# Altium PCB RADAR_D79_POWER_24V_v0.9.3.37_R10_3_37_REZONIT_IMPEDANCE_RECALC_NATIVE.PcbDoc (part 6 of 9)
Units mil, origin at the board's own origin, x right, y up, seen from the top; angles counter-clockwise.
Board outline 3110.24 x 3110.24 mil, 10 copper layers (Top Layer, RF_GND, SIG_A0, SIG_A1, PWR_A, PWR_B, SIG_B1, SIG_B0, DIGITAL_GND, Bottom Layer), stack 80.001 mil thick; 304 components, 269 nets, 1408 pads, 1372 vias.
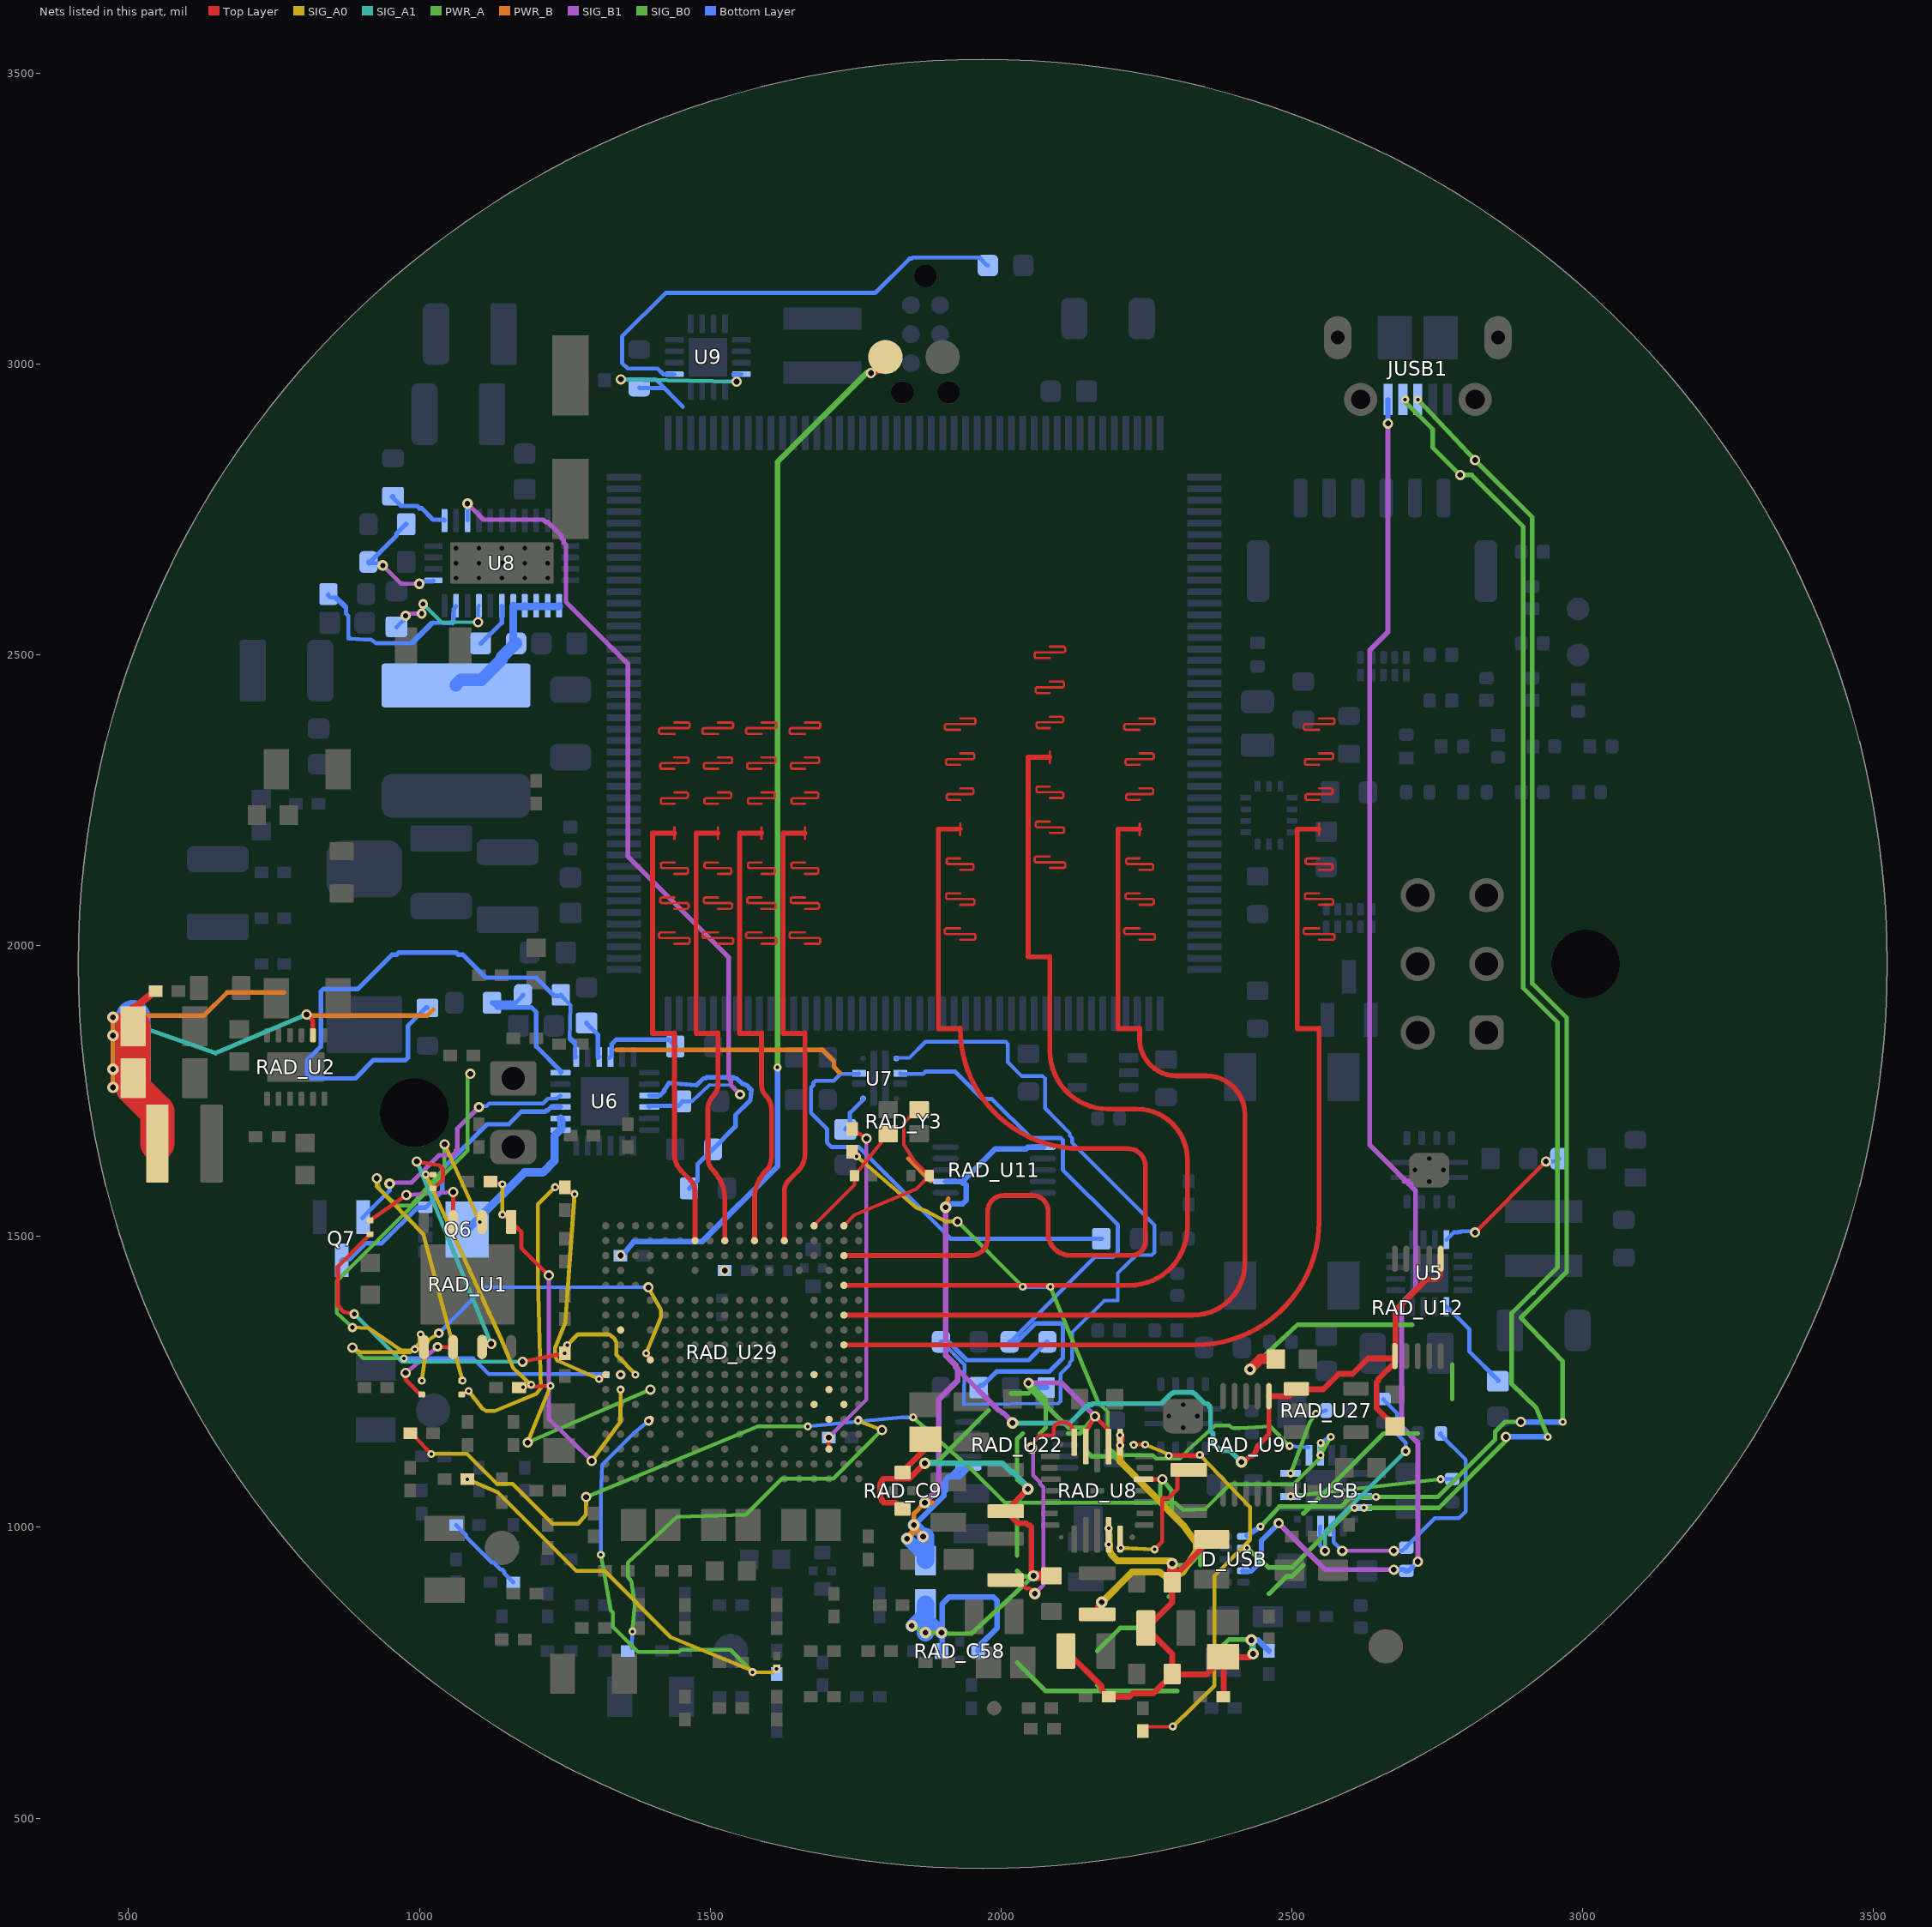
[diagram p14: the nets of this part, all layers, seen from the top]

## Via types
v1: diameter 13.77, hole 5.9, Top Layer to SIG_A0, tented both sides, 393 vias
v2: diameter 17.72, hole 9.84, Top Layer to Bottom Layer, tented both sides, 188 vias
v3: diameter 13.77/13.77/13.77 (per signal layer), hole 5.9, Top Layer to SIG_A0, tented both sides, 120 vias
v4: diameter 13.77, hole 5.9, Top Layer to SIG_A0, tented top, 104 vias
v5: diameter 19.68, hole 9.84, Top Layer to Bottom Layer, 103 vias
v6: diameter 19.68, hole 9.84, Top Layer to Bottom Layer, tented both sides, 93 vias
v7: diameter 13.78, hole 5.91, Top Layer to SIG_A0, tented both sides, 83 vias
v8: diameter 13.78, hole 5.91, SIG_B0 to Bottom Layer, tented both sides, 74 vias
v9: diameter 13.78, hole 5.91, Top Layer to SIG_A0, tented bottom, 55 vias
v10: diameter 13.78, hole 5.91, SIG_B0 to Bottom Layer, tented top, 43 vias
v11: diameter 16.54, hole 7.87, SIG_B0 to Bottom Layer, tented both sides, 22 vias
v12: diameter 22.05, hole 11.81, Top Layer to Bottom Layer, tented both sides, 17 vias
v13: diameter 17.72, hole 9.84, Top Layer to Bottom Layer, 14 vias
v14: diameter 16.54, hole 7.87, Top Layer to Bottom Layer, tented both sides, 11 vias
v15: diameter 18.11, hole 9.06, Top Layer to Bottom Layer, 7 vias
v16: diameter 22.83, hole 11.81, Top Layer to Bottom Layer, 6 vias
v17: diameter 22.05, hole 11.81, Top Layer to Bottom Layer, 6 vias
v18: diameter 22.83, hole 11.81, Top Layer to Bottom Layer, tented both sides, 5 vias
v19: diameter 17.32, hole 8.66, Top Layer to Bottom Layer, 3 vias
v20: diameter 20.47, hole 9.84, Top Layer to Bottom Layer, 3 vias
v21: diameter 16.54, hole 7.87, Top Layer to Bottom Layer, 3 vias
v22: diameter 22.05, hole 11.02, Top Layer to Bottom Layer, 2 vias
v23: diameter 19.68, hole 11.81, Top Layer to Bottom Layer, 2 vias
v24: diameter 19.68, hole 9.84, SIG_A1 to Bottom Layer, 2 vias
v25: diameter 16.54, hole 7.87, SIG_A1 to SIG_B1, tented both sides, 2 vias
v26: diameter 16.54, hole 7.87, Top Layer to SIG_A1, 2 vias
v27: diameter 13.78, hole 5.91, Top Layer to SIG_A0, 2 vias
v28: diameter 18, hole 9.84, Top Layer to Bottom Layer, tented both sides, 1 vias
v29: diameter 18.11, hole 9.06, Top Layer to Bottom Layer, tented both sides, 1 vias
v30: diameter 19.68, hole 9.84, SIG_B0 to Bottom Layer, tented both sides, 1 vias
v31: diameter 17.32, hole 7.87, Top Layer to Bottom Layer, tented both sides, 1 vias
v32: diameter 17.32, hole 7.87, SIG_A1 to Bottom Layer, tented both sides, 1 vias
v33: diameter 19.68, hole 9.84, SIG_B1 to Bottom Layer, 1 vias
v34: diameter 16.54, hole 7.87, SIG_A0 to PWR_B, tented both sides, 1 vias

## Nets (pads, with @x,y where several pads share a name; then routed paths per layer and width w, separated by ;. In a path a pad name is that pad's centre, name@x,y a point inside that pad or via, vN(x,y) a via of type N, cw(c..) or ccw(c..) an arc to the next point about the centre after c; other vN are vias at no path point) (continued)
TI_PVIN3V3: RAD_C3.2 RAD_C6.2 RAD_C8.2 RAD_C9.1 RAD_C9.3 RAD_C15.1 RAD_C31.1 RAD_C58.1 RAD_C58.3 RAD_C143.1 RAD_C144.2 RAD_C153.2 RAD_C199.1 RAD_C200.1 RAD_C201.1 RAD_C202.1 RAD_L1.2 RAD_R125.2 RAD_R200.2 RAD_U8.13 RAD_U8.20 RAD_U8.25 RAD_U8.27 | length 6761.4
  Top Layer w7.48: RAD_U8.27@2145.67,1138.78 2145.67,1164.37 v2(2161.42,1190.75) 2185.04,1167.13 RAD_U8.25@2185.04,1138.78 ; RAD_U8.20@2245.08,1082.68 v2(2277.36,1082.68)
  Top Layer w9.84: RAD_C9.1@1830.71,1031.5 1830.71,1030.51 1818.9,1042.32 1798.23,1042.32 1795.28,1045.28 1795.28,1048.23 1792.32,1051.18 1792.32,1074.8 1795.28,1077.76 1795.28,1080.71 1798.23,1083.66 ; RAD_C9.3@1830.71,1094.49 RAD_C9.3@1830.71,1095.47 ; v5(1869.09,1110.24) 1842.52,1083.66 1798.23,1083.66 ; RAD_C15.1@1870.08,1151.57 1869.09,1151.57 1866.14,1148.62 1866.14,1130.91 RAD_C9.3@1830.71,1095.47 ; v5(2046.26,1065.94) RAD_L1.2@2007.87,1027.56 2028.54,1006.89 2043.31,1006.89 2046.26,1003.94 2049.21,1003.94 2052.17,1000.98 2052.17,918.31 2055.12,915.35 v6(2055.91,916.54) ; RAD_C202.1@2111.22,787.4 2111.22,788.39 2173.23,726.38 2173.23,720.47 RAD_C200.1@2185.04,708.66 2220.47,708.66 2226.38,714.57 2261.81,714.57 RAD_C153.2@2294.29,747.05 ; RAD_C201.1@2249.02,826.77 RAD_C201.1@2250,826.77 ; RAD_C153.2@2294.29,748.03 RAD_C153.2@2294.29,747.05 ; RAD_C6.2@2294.29,905.51 RAD_C6.2@2294.29,906.5 ; RAD_C143.1@2362.2,979.33 2362.2,980.32 2294.29,912.4 RAD_C6.2@2294.29,906.5 ; RAD_R125.2@2381.89,708.66 2382.87,708.66 RAD_C31.1@2382.87,776.57 ; RAD_C31.1@2381.89,777.56 RAD_C31.1@2382.87,776.57 ; v6(2433.07,782.48) 2427.17,776.57 RAD_C31.1@2382.87,776.57 ; 1798.23,1083.66 1818.9,1083.66 RAD_C9.3@1830.71,1095.47 ; RAD_C201.1@2250,826.77 2294.29,782.48 RAD_C153.2@2294.29,747.05 ; RAD_C201.1@2250,826.77 2294.29,871.06 RAD_C6.2@2294.29,906.5 ; RAD_C153.2@2294.29,747.05 2353.35,747.05 RAD_C31.1@2382.87,776.57
  Top Layer w17.72: v6(2055.91,916.54) RAD_C8.2@2086.61,916.34 ; RAD_C6.2@2294.29,905.51 v6(2294.29,937.8) ; v6(2428.35,1271.65) 2446.06,1289.37 RAD_C3.2@2472.44,1289.37
  PWR_A w7.87: v6(1846.46,830.71) v6(1870.08,818.9) v6(1897.64,818.9) 1909.45,816.93 1948.82,816.93 1954.47,822.18 2012.66,876.31 v6(2055.91,916.54) 2047.24,915.35 2037.4,915.35 2027.56,925.2 ; v5(1869.09,1110.24) 1879.92,1112.2 1889.76,1112.2 1916.78,1139.22 1978.35,1200.79 ; 2017.72,1230.32 2047.24,1230.32 ; 2027.56,767.72 2076.77,718.5 2303.15,718.5 ; 2027.56,951.75 2027.56,1013.62 2027.56,1043.31 v5(2046.26,1065.94) ; 2076.77,1200.79 2076.77,1171.26 ; 2115.7,1161.42 2135.83,1161.42 v2(2161.42,1190.75) ; 2145.67,1137.26 2145.67,1131.89 2155.51,1122.05 2194.88,1122.05 2222.98,1093.95 2234.25,1082.68 ; 2288.32,880.84 2293.31,885.83 2293.31,925.2 v6(2294.29,937.8) ; 2293.31,1023.62 2293.31,1029.27 2293.31,1062.99 v2(2277.36,1082.68) ; 2342.52,935.04 2342.52,974.41 ; 2377.16,792.51 2391.73,807.09 2421.26,807.09 v6(2430.12,806.1) 2431.1,797.24 2431.1,787.4 v6(2433.07,782.48) ; 2027.56,1082.68 v5(2046.26,1065.94) ; 2027.56,1082.68 2027.56,1116.64 ; 2027.56,1082.68 v5(2046.26,1065.94) ; 2027.56,1082.68 2027.56,1116.64 ; 2027.56,1082.68 v5(2046.26,1065.94) ; 2027.56,1082.68 2027.56,1116.64 ; 2027.56,1116.64 2027.56,1151.57 ; 2027.56,1116.64 2027.56,1151.57 ; 2027.56,1116.64 2027.56,1151.57 ; 2027.56,1151.57 2037.4,1161.42 ; 2027.56,1151.57 2037.4,1161.42 ; 2027.56,1151.57 2037.4,1161.42 ; 2027.56,1151.57 2037.4,1161.42 ; v2(2047.24,1248.03) 2047.24,1240.16 2079.36,1208.04 2116.14,1171.26 2117.43,1171.26 2145.67,1171.26 ; v2(2047.24,1248.03) 2076.77,1220.47 ; v2(2047.24,1248.03) 2076.77,1220.47 ; 2066.93,1161.42 2076.77,1171.26 ; 2066.93,1161.42 2076.77,1171.26 ; 2066.93,1161.42 2076.77,1171.26 ; 2076.77,1171.26 2076.77,1201.81 ; 2076.77,1171.26 2076.77,1201.81 ; 2076.77,1201.81 2076.77,1220.47 ; 2076.77,1201.81 2076.77,1220.47 ; 2145.67,1171.26 v2(2161.42,1190.75) ; 2145.67,1171.26 v2(2161.42,1190.75) ; 2175.2,718.5 2165.35,728.35 2175.2,718.5 ; 2175.2,718.5 2303.15,718.5 ; 2175.2,718.5 2303.15,718.5 ; 2204.72,826.77 2234.25,826.77 2204.72,826.77 ; 2204.72,826.77 2165.35,787.4 2204.72,826.77 ; 2273.62,1043.31 2273.62,1072.83 ; 2273.62,1043.31 2287.06,1029.87 2273.62,1043.31 ; 2273.62,1043.31 2273.62,1072.83 ; 2273.62,1072.83 v2(2277.36,1082.68) ; 2273.62,1072.83 v2(2277.36,1082.68) ; v6(2294.29,937.8) v6@2303.15,935.04 ; v6(2294.29,937.8) v6@2303.15,935.04 ; v6@2303.15,935.04 2322.83,935.04 ; v6@2303.15,935.04 2322.83,935.04 ; 2322.83,935.04 2342.52,954.72 ; 2322.83,935.04 2342.52,954.72 ; 2342.52,954.72 2342.52,956.98 ; 2342.52,954.72 2342.52,956.98 ; 2342.52,956.98 2342.52,974.41 ; 2342.52,956.98 2342.52,974.41 ; 2471.33,1312.15 2509.84,1348.43 ; 2471.33,1312.15 v6(2428.35,1271.65) 2471.33,1312.15 ; 2471.33,1312.15 2509.84,1348.43 ; 2490.16,915.35 2460.63,885.83 2490.16,915.35 ; 2490.16,915.35 2500,915.35 ; 2490.16,915.35 2500,915.35 ; 2500,915.35 2519.68,935.04 2500,915.35 ; 2509.84,1348.43 2706.69,1348.43 2509.84,1348.43 ; 2657.48,1161.42 2519.68,1023.62 2657.48,1161.42 ; 2657.48,1161.42 2716.54,1161.42 2657.48,1161.42 ; 2775.59,1220.47 2775.59,1279.53 2775.59,1220.47
  SIG_A0 w11.81: v9(2185.04,998.03) 2186.52,960.63 2188.98,954.23 2200.3,942.42 2289.86,942.42 v6(2294.29,937.8)
  SIG_A1 w9.84: v5(1869.09,1110.24) 2001.97,1110.24 2016.73,1095.47 2019.68,1095.47 2043.31,1071.85 2043.31,1068.9 v5(2046.26,1065.94) ; v6(2430.12,806.1) 2433.07,803.15 v6(2433.07,782.48)
  SIG_B1 w8.66: v2(2047.24,1248.03) 2104.33,1248.03 2161.42,1190.94 v2(2161.42,1190.75)
  Bottom Layer w8.66: v2(2047.24,1248.03) 2055.12,1240.16 2078.74,1240.16 RAD_C144.2@2077.76,1240.16
  Bottom Layer w9.84: RAD_C58.3@1897.64,787.4 RAD_C58.3@1898.62,788.39 ; v6(1897.64,818.9) 1898.62,817.91 RAD_C58.3@1898.62,788.39 ; RAD_C58.1@1960.63,787.4 1960.63,788.39 1963.58,791.34 1963.58,797.24 1993.11,826.77 1993.11,874.02 1987.2,879.92 1910.43,879.92 1898.62,868.11 RAD_C58.3@1898.62,788.39 ; v6(2430.12,806.1) 2441.93,806.1 2459.65,788.39 RAD_C199.1@2460.63,787.4
  Bottom Layer w21.65: v6(1846.46,830.71) RAD_R200.2@1870.08,854.33 ; RAD_R200.2@1870.08,846.46 v6(1897.64,818.9)
  Bottom Layer w29.53: v6(1870.08,818.9) RAD_R200.2@1870.08,868.11 ; RAD_R200.2@1870.08,846.46 RAD_R200.2@1870.08,868.11 ; RAD_R200.2@1870.08,854.33 RAD_R200.2@1870.08,868.11
  other v9: 2185.04,970.47
TI_QSPI_CS: RAD_R38.1 RAD_U1.1 RAD_U29.U12 | length 701.2
  Top Layer w6.69: RAD_R38.1@1122.05,1594.49 v7(1142.72,1589.57) ; v7(1142.72,1537.4) RAD_U1.1@1157.48,1525.59
  Top Layer w7.09: RAD_U1.1@1157.68,1524.67 1157.48,1525.59 1175.2,1507.87 1175.2,1480.32 v2(1222.44,1433.07)
  SIG_A0 w6.69: v7(1142.72,1537.4) v7(1142.72,1589.57)
  SIG_A0 w7.09: v2(1296.26,1114.17) 1345.47,1181.1 v9(1345.89,1236.8)
  SIG_B1 w7.09: v2(1222.44,1433.07) 1222.44,1187.01 v2(1296.26,1114.17)
TI_QSPI_D0: RAD_R45.2 RAD_U29.U11
  other v21: 1345.89,1262.39
TI_QSPI_D0_FLASH: RAD_R45.1 RAD_U1.5 | length 1317.4
  Top Layer w6.69: v7(992.13,1306.1) RAD_U1.5@1007.68,1309.98 ; v7(1001.97,1331.69) RAD_U1.5@1010.54,1294.69
  PWR_A w6.69: v14(884.84,1343.5) 858.27,1368.11 858.27,1423.23 1082.68,1647.64 1082.68,1775.59 v2(1087.6,1779.53)
  SIG_A0 w6.69: v2(884.84,1309.06) 897.64,1301.18 984.25,1301.18 1000,1316.93 1000,1329.72 v7(1001.97,1331.69) ; v14(884.84,1343.5) 912.4,1342.52 968.5,1304.13 981.3,1304.13 v7(992.13,1306.1) ; v2@1083.66,1775.59 v2(1087.6,1779.53)
  SIG_B0 w6.69: v2(884.84,1309.06) 903.54,1290.35 v8(973.43,1290.35)
  Bottom Layer w6.69: v8(973.43,1290.35) 1092.52,1290.35 1119.09,1263.78 RAD_R45.1@1322.08,1263.57
TI_QSPI_D1: RAD_R39.1 RAD_R49.1 RAD_U29.V11 | length 942.2
  Top Layer w6.69: RAD_R39.1@1072.83,1228.35 v7(1084.65,1234.25) ; v7(1233.27,1584.65) RAD_R49.1@1250,1584.65 v7(1266.73,1572.83) ; v7(1309.06,1254.92) RAD_U29.V11@1320.3,1262.39
  SIG_A0 w6.69: v7(1084.65,1234.25) 1108.27,1203.74 1115.16,1199.8 1128.94,1199.8 1200.79,1229.33 1208.66,1239.17 1203.74,1429.13 1203.74,1555.12 v7(1233.27,1584.65) ; v7(1266.73,1572.83) 1250.98,1352.36 1233.27,1308.07 1233.27,1293.31 1237.2,1286.42 v7(1309.06,1254.92)
TI_QSPI_D1_FLASH: RAD_R39.2 RAD_U1.2 | length 747.9
  SIG_A0 w6.69: v2(926.67,1599.9) 926.67,1586.12 1006.89,1503.94 v9(1074.02,1252.17) ; v2(1043.31,1658.46) v9(1103.82,1524.67)
  SIG_B0 w6.69: v2(926.67,1599.9) 931.59,1580.71 962.11,1553.15 985.73,1553.15 1043.31,1617.62 v2(1043.31,1658.46)
TI_QSPI_D2: RAD_R42.1 RAD_R43.1 RAD_U29.T11 | length 765.2
  Top Layer w7.09: v14(887.99,1366.54) 870.08,1370.37 859.84,1380.61 859.84,1448.43 RAD_R42.1@915.35,1503.94 ; v2(1177.17,1284.65) v9(1250,1299.21) ; v7(1253.94,1312.99) RAD_R43.1@1255.12,1292.13
  SIG_A0 w7.09: v7(1253.94,1312.99) 1272.64,1331.69 1324.8,1331.69 1328.74,1330.22 1335.63,1324.31 1338.58,1317.42 1338.58,1296.26 v9(1371.48,1262.39)
  SIG_A1 w7.09: v14(887.99,1366.54) 969.88,1284.65 v2(1177.17,1284.65)
TI_QSPI_D2_FLASH: RAD_R42.2 RAD_U1.3 | length 208.5
  Top Layer w7.09: RAD_R42.2@915.35,1527.56 v2(977.56,1571.26) ; RAD_U1.3@1057.68,1524.67 v2(1058.17,1576.38)
  SIG_B1 w7.09: v2(977.56,1571.26) v2(1058.17,1576.38)
TI_QSPI_D3: RAD_R40.2 RAD_R41.1 RAD_U29.R12 | length 837.6
  Top Layer w6.69: v7(1010.83,1606.3) RAD_R40.2@1023.62,1606.3 ; RAD_R41.1@1171.26,1240.16 v7(1191.93,1245.08) ; v9(1178.15,1241.14) v7(1225.39,1243.11)
  SIG_A0 w6.69: v7(1010.83,1606.3) 1141.73,1320.87 1161.42,1273.62 v7(1191.93,1245.08) v9(1178.15,1241.14) ; v2(1186.02,1145.67) v7(1225.39,1243.11)
  SIG_B0 w6.69: v2(1186.02,1145.67) v13(1397.08,1236.8)
TI_QSPI_D3_FLASH: RAD_R40.1 RAD_U1.7 | length 444.2
  Top Layer w7.09: v2(995.47,1628.84) 1033.86,1622.44 1040.26,1616.04 1040.26,1596.85 RAD_R40.1@1023.62,1582.68 ; RAD_U1.7@1107.68,1309.98 v2(1123.43,1315.35)
  SIG_A1 w7.09: v2(995.47,1628.84) v2(1123.43,1315.35)
TI_QSPI_SCLK: RAD_R44.2 RAD_U29.R10 | length 623.1
  Top Layer w6.69: v7(1389.76,1299.21) RAD_U29.R10@1397.08,1287.98
  SIG_A0 w6.69: v9(1003.94,1251.97) 1013.78,1317.91 1015.75,1321.85 v14(1033.46,1333.66) ; v7(1389.76,1299.21) 1415.35,1361.22 1415.35,1373.03 v2(1393.7,1412.4)
  Bottom Layer w6.69: v14(1033.46,1333.66) 1112.2,1413.39 v2(1393.7,1412.4)
TI_QSPI_SCLK_FLASH: RAD_R44.1 RAD_U1.6 | length 147.1
  Top Layer w7.09: v2(976.28,1265.45) 976.28,1253.94 1001.87,1228.35 RAD_R44.1@1003.94,1228.35 ; v14(1031.3,1310.24) RAD_U1.6@1057.68,1309.98
  SIG_B1 w7.09: v2(976.28,1265.45) v14(1031.3,1310.24)
TI_REGOUT_3V3: RAD_C22.2 RAD_C23.1 RAD_C25.1 RAD_C26.1 RAD_C29.1 RAD_C145.1 RAD_L6.2 RAD_R200.1 RAD_U2.8 RAD_U9.6 RAD_U11.2 RAD_U11.6 RAD_U12.1 RAD_U12.6 RAD_U22.6 RAD_U27.1 | length 4996.3
  Top Layer w8: v28(805.91,1881.42) 816.93,1870.39 RAD_U2.8@816.93,1846.06
  Top Layer w8.66: v6(2413.39,1112.2) 2415.35,1114.17 2419.29,1114.17 2427.17,1122.05 2431.1,1122.05 2437.01,1127.95 2437.01,1129.92 2438.98,1131.89 2438.98,1135.83 2440.94,1137.8 2440.94,1139.76 2460.63,1159.45 2460.63,1226.38 RAD_U9.6@2459.65,1225.39
  Top Layer w9.84: RAD_U9.6@2460.63,1225.39 2459.65,1225.39 2495.08,1225.39 RAD_U27.1@2506.89,1237.2 ; RAD_U27.1@2507.87,1238.19 RAD_U27.1@2506.89,1237.2 ; RAD_C145.1@2677.17,1173.23 2678.15,1172.24 2645.67,1204.72 2645.67,1249.02 2648.62,1251.97 2648.62,1254.92 2678.15,1284.45 RAD_U12.6@2678.15,1293.31 ; RAD_U12.6@2677.17,1294.29 RAD_U12.6@2678.15,1293.31 ; RAD_U12.1@2755.91,1461.61 2754.92,1461.61 2754.92,1432.09 2749.02,1426.18 2731.3,1426.18 2678.15,1373.03 RAD_U12.6@2678.15,1293.31 ; RAD_U27.1@2506.89,1237.2 2554.13,1237.2 2580.71,1263.78 2604.33,1263.78 2630.91,1290.35 2675.2,1290.35 RAD_U12.6@2678.15,1293.31
  Top Layer w12.6: RAD_C25.1@507.82,1891.04 RAD_C22.2@546.28,1921.91
  Top Layer w13.78: v6(473.03,1756.27) RAD_C29.1@507.82,1756.27 ; v6(473.03,1787.76) RAD_C29.1@507.82,1787.76 ; v6(473.03,1845.37) RAD_C25.1@507.82,1845.37 ; v6(473.03,1876.87) RAD_C25.1@507.82,1876.87
  Top Layer w17.72: RAD_C25.1@507.82,1861.12 RAD_C25.1@507.82,1891.04
  Top Layer w59.06: RAD_C25.1@507.82,1861.12 507.82,1756.15 549.41,1714.57 RAD_L6.2@549.41,1659.68
  PWR_B w7.87: v6(473.03,1756.27) v6(473.03,1787.76) v6(473.03,1845.37) v6(473.03,1876.87) 482.28,1879.92 531.6,1879.92 629.92,1879.92 669.29,1919.29 762.45,1919.29 767.72,1919.29 ; v28(805.91,1881.42) 816.93,1879.92 864.86,1879.92 1013.78,1879.92 1023.62,1889.76 ; 1338.58,1820.87 1692.91,1820.87 1712.6,1801.18 1712.6,1791.34 1722.44,1781.5 ; v6(1838.58,980.32) 1850.39,994.09 v6(1850.39,1003.94) ; 1840.55,1633.86 1878.69,1595.71 ; v6(1866.14,984.25) v6(1850.39,1003.94) ; 1882.87,1042.32 v5(1869.09,1042.32) 1850.39,1023.62 v6(1850.39,1003.94) ; v5(1904.53,1550.2) 1909.45,1564.96
  PWR_B w11.81: v6(1838.58,980.32) 1850.39,994.09 v6(1850.39,1003.94)
  SIG_A1 w7.87: v6(473.03,1876.87) 649.61,1814.96 v28(805.91,1881.42)
  SIG_A1 w8.66: v6(2019.68,1179.13) 2118.11,1179.13 2147.64,1208.66 2149.61,1208.66 2151.57,1210.63 2155.51,1210.63 2157.48,1212.6 2275.59,1212.6 2293.31,1230.32 2295.28,1230.32 2297.24,1232.28 2328.74,1232.28 2330.71,1230.32 2332.68,1230.32 2350.39,1212.6 2354.33,1212.6 2358.27,1208.66 2358.27,1206.69 2360.24,1204.72 2360.24,1165.35 2364.17,1161.42 2364.17,1145.67 2366.14,1143.7 2366.14,1141.73 2372.05,1135.83 2374.02,1135.83 2375.98,1133.86 2377.95,1133.86 2379.92,1131.89 2393.7,1131.89 v6(2413.39,1112.2)
  SIG_B1 w8.66: 1922.24,1275.59 1921.26,1275.59 1996.06,1200.79 1998.03,1200.79 2001.97,1196.85 2003.94,1196.85 2017.72,1183.07 2017.72,1181.1 v6(2019.68,1179.13)
  SIG_B1 w9.84: v5(1869.09,1042.32) 1892.72,1065.94 1892.72,1219.49 1925.2,1251.97 1925.2,1272.64 1922.24,1275.59 1922.24,1278.54 1904.53,1296.26 v5(1904.53,1550.2)
  Bottom Layer w9.84: v6(1850.39,1003.94) 1851.38,1003.94 1901.57,1054.13 1901.57,1060.04 1904.53,1062.99 1904.53,1080.71 ; v5(1869.09,1042.32) 1904.53,1077.76 1904.53,1080.71 ; v5(1904.53,1550.2) 1910.43,1556.1 1934.06,1556.1 1939.96,1562.01 1939.96,1588.58 1937.01,1591.54 1934.06,1591.54 1931.1,1594.49 RAD_U11.2@1904.53,1594.49 1934.06,1594.49 1990.16,1650.59 2043.31,1650.59 2046.26,1653.54 2072.83,1653.54 RAD_U11.6@2071.85,1653.54 ; RAD_U22.6@1943.9,1102.36 RAD_U22.6@1942.91,1101.38 ; 1904.53,1080.71 1910.43,1086.61 ; 1910.43,1086.61 1928.15,1086.61 RAD_U22.6@1942.91,1101.38 ; 1910.43,1086.61 1913.39,1086.61 1928.15,1101.38 RAD_U22.6@1942.91,1101.38
  Bottom Layer w13.78: v6(473.03,1756.27) RAD_C26.1@507.82,1756.27 ; v6(473.03,1787.76) RAD_C26.1@507.82,1787.76 ; v6(473.03,1845.37) RAD_C23.1@507.82,1845.37 ; v6(473.03,1876.87) RAD_C23.1@507.82,1876.87
  Bottom Layer w21.65: v6(1838.58,980.32) RAD_R200.1@1870.08,948.82 ; v6(1850.39,1003.94) v6@1870.08,984.25 ; v6(1866.14,984.25) v6@1870.08,980.32
  Bottom Layer w29.53: RAD_R200.1@1870.08,948.82 RAD_R200.1@1870.08,942.91 ; v6@1870.08,980.32 RAD_R200.1@1870.08,942.91 ; v6@1870.08,984.25 RAD_R200.1@1870.08,942.91
  Bottom Layer w59.06: RAD_C26.1@507.82,1756.27 RAD_C23.1@507.82,1876.87
TI_RX1: RAD_U29.M2 | length 1487.5
  Top Layer w4: 1438.41,2003.15 1462.83,2003.15 1464.8,2005.12 1464.8,2010.98 1462.83,2012.95 1414,2012.95 1412.03,2014.92 1412.03,2020.77 1414,2022.74 1438.41,2022.74 ; 1438.41,2063.29 1460.71,2063.29 1462.67,2065.26 1462.67,2071.12 1460.71,2073.09 1416.12,2073.09 1414.15,2075.06 1414.15,2080.92 1416.12,2082.88 1438.41,2082.88 ; 1438.41,2123.44 1459.53,2123.44 1461.49,2125.4 1461.49,2131.26 1459.53,2133.23 1417.3,2133.23 1415.33,2135.2 1415.33,2141.06 1417.3,2143.03 1438.41,2143.03 ; 1438.41,2183.58 1438.41,2193.37 1438.41,2203.17 ; 1438.41,2243.72 1417.3,2243.72 1415.33,2245.69 1415.33,2251.55 1417.3,2253.51 1459.53,2253.51 1461.49,2255.48 1461.49,2261.34 1459.53,2263.31 1438.41,2263.31 ; 1438.41,2303.86 1416.12,2303.86 1414.15,2305.83 1414.15,2311.69 1416.12,2313.66 1460.71,2313.66 1462.67,2315.63 1462.67,2321.48 1460.71,2323.45 1438.41,2323.45 ; 1438.41,2364 1414,2364 1412.03,2365.97 1412.03,2371.83 1414,2373.8 1462.83,2373.8 1464.8,2375.77 1464.8,2381.63 1462.83,2383.59 1438.41,2383.59
  Top Layer w8.4: 1438.41,1849.22 1401.01,1849.22 1401.01,2193.37 1438.41,2193.37 ; 1438.41,1850.21 1438.41,1641.36 ccw(c1479.21,1641.36) 1450.36,1612.51 1465.86,1597.01 cw(c1446.59,1577.74) 1473.85,1577.74 RAD_U29.M2@1473.85,1492.7
TI_RX2: RAD_U29.K2 | length 1488.1
  Top Layer w4: 1513.22,2003.15 1537.63,2003.15 1539.6,2005.12 1539.6,2010.98 1537.63,2012.95 1488.8,2012.95 1486.83,2014.92 1486.83,2020.77 1488.8,2022.74 1513.22,2022.74 ; 1513.22,2063.29 1535.51,2063.29 1537.48,2065.26 1537.48,2071.12 1535.51,2073.09 1490.92,2073.09 1488.96,2075.06 1488.96,2080.92 1490.92,2082.88 1513.22,2082.88 ; 1513.22,2123.44 1534.33,2123.44 1536.3,2125.4 1536.3,2131.26 1534.33,2133.23 1492.1,2133.23 1490.14,2135.2 1490.14,2141.06 1492.1,2143.03 1513.22,2143.03 ; 1513.22,2183.58 1513.22,2193.37 1513.22,2203.17 ; 1513.22,2243.72 1492.1,2243.72 1490.14,2245.69 1490.14,2251.55 1492.1,2253.51 1534.33,2253.51 1536.3,2255.48 1536.3,2261.34 1534.33,2263.31 1513.22,2263.31 ; 1513.22,2303.86 1490.92,2303.86 1488.96,2305.83 1488.96,2311.69 1490.92,2313.66 1535.51,2313.66 1537.48,2315.63 1537.48,2321.48 1535.51,2323.45 1513.22,2323.45 ; 1513.22,2364 1488.8,2364 1486.83,2365.97 1486.83,2371.83 1488.8,2373.8 1537.63,2373.8 1539.6,2375.77 1539.6,2381.63 1537.63,2383.59 1513.22,2383.59
  Top Layer w8.4: 1513.22,1849.22 1475.82,1849.22 1475.82,2193.37 1513.22,2193.37 ; 1513.22,1850.21 1513.22,1760.27 cw(c1487.73,1760.27) 1505.75,1742.24 ccw(c1529.41,1718.59) 1495.95,1718.59 1495.95,1635.46 ccw(c1527.78,1635.46) 1505.27,1612.96 cw(c1457.59,1565.27) 1525.03,1565.27 RAD_U29.K2@1525.03,1492.7
TI_RX3: RAD_U29.H2 | length 1488.1
  Top Layer w4: 1588.02,2003.15 1612.44,2003.15 1614.41,2005.12 1614.41,2010.98 1612.44,2012.95 1563.6,2012.95 1561.63,2014.92 1561.63,2020.77 1563.6,2022.74 1588.02,2022.74 ; 1588.02,2063.29 1610.31,2063.29 1612.28,2065.26 1612.28,2071.12 1610.31,2073.09 1565.73,2073.09 1563.76,2075.06 1563.76,2080.92 1565.73,2082.88 1588.02,2082.88 ; 1588.02,2123.44 1609.13,2123.44 1611.1,2125.4 1611.1,2131.26 1609.13,2133.23 1566.91,2133.23 1564.94,2135.2 1564.94,2141.06 1566.91,2143.03 1588.02,2143.03 ; 1588.02,2183.58 1588.02,2193.37 1588.02,2203.17 ; 1588.02,2243.72 1566.91,2243.72 1564.94,2245.69 1564.94,2251.55 1566.91,2253.51 1609.13,2253.51 1611.1,2255.48 1611.1,2261.34 1609.13,2263.31 1588.02,2263.31 ; 1588.02,2303.86 1565.73,2303.86 1563.76,2305.83 1563.76,2311.69 1565.73,2313.66 1610.31,2313.66 1612.28,2315.63 1612.28,2321.48 1610.31,2323.45 1588.02,2323.45 ; 1588.02,2364 1563.6,2364 1561.63,2365.97 1561.63,2371.83 1563.6,2373.8 1612.44,2373.8 1614.41,2375.77 1614.41,2381.63 1612.44,2383.59 1588.02,2383.59
  Top Layer w8.4: RAD_U29.H2@1576.21,1492.7 1576.21,1565.27 cw(c1643.65,1565.27) 1595.96,1612.96 ccw(c1573.46,1635.46) 1605.28,1635.46 1605.28,1718.59 ccw(c1571.83,1718.59) 1595.49,1742.24 cw(c1613.51,1760.27) 1588.02,1760.27 1588.02,1850.21 ; 1588.02,1849.22 1550.62,1849.22 1550.62,2193.37 1588.02,2193.37
TI_RX4: RAD_U29.F2 | length 1487.5
  Top Layer w4: 1662.82,2003.15 1687.24,2003.15 1689.21,2005.12 1689.21,2010.98 1687.24,2012.95 1638.41,2012.95 1636.44,2014.92 1636.44,2020.77 1638.41,2022.74 1662.82,2022.74 ; 1662.82,2063.29 1685.12,2063.29 1687.08,2065.26 1687.08,2071.12 1685.12,2073.09 1640.53,2073.09 1638.56,2075.06 1638.56,2080.92 1640.53,2082.88 1662.82,2082.88 ; 1662.82,2123.44 1683.94,2123.44 1685.9,2125.4 1685.9,2131.26 1683.94,2133.23 1641.71,2133.23 1639.74,2135.2 1639.74,2141.06 1641.71,2143.03 1662.82,2143.03 ; 1662.82,2183.58 1662.82,2193.37 1662.82,2203.17 ; 1662.82,2243.72 1641.71,2243.72 1639.74,2245.69 1639.74,2251.55 1641.71,2253.51 1683.94,2253.51 1685.9,2255.48 1685.9,2261.34 1683.94,2263.31 1662.82,2263.31 ; 1662.82,2303.86 1640.53,2303.86 1638.56,2305.83 1638.56,2311.69 1640.53,2313.66 1685.12,2313.66 1687.08,2315.63 1687.08,2321.48 1685.12,2323.45 1662.82,2323.45 ; 1662.82,2364 1638.41,2364 1636.44,2365.97 1636.44,2371.83 1638.41,2373.8 1687.24,2373.8 1689.21,2375.77 1689.21,2381.63 1687.24,2383.59 1662.82,2383.59
  Top Layer w8.4: RAD_U29.F2@1627.39,1492.7 1627.39,1577.74 cw(c1654.64,1577.74) 1635.37,1597.01 1650.87,1612.51 ccw(c1622.03,1641.36) 1662.82,1641.36 1662.82,1850.21 ; 1662.82,1849.22 1625.42,1849.22 1625.42,2193.37 1662.82,2193.37
TI_SOP0_TDO: RAD_R310.1 RAD_R386.1 | length 142.7
  Bottom Layer w7.09: RAD_R310.1@1062.99,1003.94 1080.71,986.22 1080.71,983.27 1125,938.98 1127.95,938.98 1139.76,927.17 1142.72,927.17 1145.67,924.21 1145.67,921.26 1160.43,906.5 RAD_R386.1@1161.42,905.51
TI_SOP1_MSS_SPIB_CS2: RAD_R305.1 RAD_U29.R14 | length 705.9
  SIG_B0 w6.69: v8(1312.01,952.76) 1328.74,857.28 1332.68,853.35 1332.68,828.74 1375.98,785.43 1445.87,785.43 1449.8,789.37 1534.45,789.37 v8(1572.83,750.98)
  Bottom Layer w6.69: v8(1312.01,952.76) 1312.01,1057.09 1313.98,1107.28 1369.09,1162.4 v21(1394.12,1182.67) ; v8(1572.83,750.98) 1604.33,750 RAD_R305.1@1609.06,755.12
TI_SOP2_PMIC_CLK: RAD_R218.2 RAD_R299.1 | length 654.2
  SIG_A0 w6.69: v9(1082.68,1082.68) 1134.84,1060.04 1269.68,925.2 1318.9,925.2 1432.09,811.02 1578.74,750.98 1607.28,750 v9(1614.17,756.69)
TI_SOP3_MSS_UARTB_TX: RAD_R301.1 RAD_U29.A14 | length 722.5
  Top Layer w6.69: RAD_U29.A14@1753.18,1183.45 v9(1753.94,1183.07)
  SIG_A0 w6.69: v9(1753.94,1183.07) v2(1795.28,1167.32)
  SIG_B0 w6.69: v8(1366.14,820.87) 1370.08,866.14 1364.17,907.48 1358.27,915.35 1358.27,938.98 1442.91,1017.72 1561.02,1021.65 1623.03,1083.66 1711.61,1083.66 1763.78,1135.83 v2(1795.28,1167.32)
  Bottom Layer w6.69: RAD_R301.1@1365.35,792.52 v8(1366.14,820.87)
TI_SOP4_MSS_UARTA_TX: RAD_R128.1 RAD_R309.1 RAD_U29.C16 | length 591.8
  Top Layer w6.69: v2(1703.74,1154.53) 1703.74,1133.86 RAD_U29.C16@1704.16,1134.44 ; RAD_R128.1@1744.09,1685.04 v2(1768.7,1668.31)
  SIG_B1 w6.69: v2(1703.74,1154.53) 1768.7,1219.49 v2(1768.7,1668.31)
TI_SW_B1: RAD_L9.1 RAD_U8.28 | length 440.6
  Top Layer w7.09: RAD_L9.1@2007.87,909.45 2028.54,909.45 2043.31,894.68 2049.21,894.68 v5(2058.07,885.83) ; v5(2052.17,1136.81) 2060.04,1152.56 2067.91,1157.48 2087.6,1157.48 2090.55,1160.43 2090.55,1170.28 2092.52,1175.2 2100.39,1180.12 2112.2,1180.12 2120.08,1175.2 RAD_U8.28@2125.98,1160.62 ; RAD_U8.28@2125.98,1145.67 RAD_U8.28@2125.98,1146.16
  SIG_B1 w7.09: v5(2052.17,1136.81) 2055.12,1133.86 2055.12,1089.57 2066.93,1077.76 2066.93,1074.8 2072.83,1068.9 2072.83,930.12 2075.79,927.17 2075.79,906.5 2072.83,903.54 2072.83,900.59 v5(2058.07,885.83)
TI_SW_B2: RAD_L8.1 RAD_U8.24 | length 519.5
  Top Layer w7.09: RAD_L8.1@2165.35,850.39 2164.37,850.39 2164.37,862.2 v5(2173.23,871.06) ; RAD_U8.24@2204.72,1146.16 2205.71,1145.67 2208.66,1148.62 RAD_U8.24@2208.66,1154.53
  Top Layer w11.81: v9(2204.72,1140.75) RAD_U8.24@2204.72,1146.16
  SIG_A0 w11.81: v5(2173.23,871.06) 2225.39,923.23 2270.67,923.23 2273.62,922.24 2282.48,915.35 2300.2,915.35 2312.01,922.24 2335.63,958.66 2335.63,972.44 2334.65,974.41 2313.98,1002.95 2204.72,1113.19 v9(2204.72,1158.46) v9(2204.72,1140.75)
TI_SW_B3: RAD_L2.1 RAD_U8.14 | length 257.2
  Top Layer w7.09: RAD_U8.14@2204.72,979.82 2204.72,962 v9(2205.71,964.57) ; v7(2264,962) 2277,975 2277,1049 2278,1050 2288,1050 2303,1065 2303,1098.43 RAD_L2.1@2322.83,1098.43
  SIG_A0 w7.09: v9(2205.71,964.57) v7(2264,962)
TI_SYNCCLKIN: RAD_R75.2 RAD_U8.23 | length 799.1
  Top Layer w6.69: RAD_U8.23@2225.63,1142.85 v7(2228.35,1141.73) v27(2247.7,1142.22) ; RAD_R75.2@2238.98,656.69 2243.99,656.76 v7(2295.28,657.48) ; v27(2288.39,1123.03) v7@2341.62,1121.2 ; v27@2291.34,1124.41 v7(2341.73,1124.41)
  Top Layer w7.09: RAD_R75.2@2238.98,656.69 2244.09,656.69 RAD_R75.2@2244.09,649.61
  SIG_A0 w6.69: v27(2247.7,1142.22) 2289.29,1125.25 v27@2291.34,1124.41 ; v7(2295.28,657.48) 2366.93,727.56 2366.93,916.54 2428.35,977.95 2428.35,1034.65 v7(2341.73,1124.41)
TI_TCK: RAD_U29.C12
TI_TDI: RAD_U29.D13
TI_TMS: RAD_U29.C14
TI_TX1: RAD_U29.B3 | length 2386.8
  Top Layer w4: 1929.74,2010.1 1954.15,2010.1 1956.12,2012.07 1956.12,2017.93 1954.15,2019.9 1905.32,2019.9 1903.35,2021.86 1903.35,2027.72 1905.32,2029.69 1929.74,2029.69 ; 1929.74,2070.24 1952.03,2070.24 1954,2072.21 1954,2078.07 1952.03,2080.04 1907.45,2080.04 1905.48,2082.01 1905.48,2087.86 1907.45,2089.83 1929.74,2089.83 ; 1929.74,2130.38 1950.85,2130.38 1952.82,2132.35 1952.82,2138.21 1950.85,2140.18 1908.63,2140.18 1906.66,2142.15 1906.66,2148.01 1908.63,2149.98 1929.74,2149.98 ; 1929.74,2190.53 1929.74,2200.32 1929.74,2210.12 ; 1929.74,2250.67 1908.63,2250.67 1906.66,2252.64 1906.66,2258.5 1908.63,2260.46 1950.85,2260.46 1952.82,2262.43 1952.82,2268.29 1950.85,2270.26 1929.74,2270.26 ; 1929.74,2310.81 1907.45,2310.81 1905.48,2312.78 1905.48,2318.64 1907.45,2320.61 1952.03,2320.61 1954,2322.57 1954,2328.43 1952.03,2330.4 1929.74,2330.4 ; 1929.74,2370.95 1905.32,2370.95 1903.35,2372.92 1903.35,2378.78 1905.32,2380.75 1954.15,2380.75 1956.12,2382.72 1956.12,2388.57 1954.15,2390.54 1929.74,2390.54
  Top Layer w8.4: RAD_U29.B3@1729.75,1467.11 1947.25,1467.11 ccw(c1947.25,1496.94) 1977.08,1496.94 1977.08,1543.13 cw(c2004.41,1543.13) 2004.41,1570.46 2054.41,1570.46 cw(c2054.41,1544.11) 2080.76,1544.11 2080.76,1505.64 ccw(c2118.96,1505.64) 2118.96,1467.45 2224.28,1467.45 ccw(c2224.28,1491.29) 2248.12,1491.29 2248.12,1620.82 ccw(c2217.95,1620.82) 2217.95,1651 2136.82,1651 cw(c2136.82,1858.08) 1929.74,1858.08 ; 1929.74,1857.1 1892.34,1857.1 1892.34,2200.32 1929.74,2200.32
TI_TX2: RAD_U29.B5 | length 2386.9
  Top Layer w4: 2083.99,2133.53 2108.41,2133.53 2110.38,2135.49 2110.38,2141.35 2108.41,2143.32 2059.57,2143.32 2057.6,2145.29 2057.6,2151.15 2059.57,2153.12 2083.99,2153.12 ; 2083.99,2193.67 2106.28,2193.67 2108.25,2195.64 2108.25,2201.49 2106.28,2203.46 2061.7,2203.46 2059.73,2205.43 2059.73,2211.29 2061.7,2213.26 2083.99,2213.26 ; 2083.99,2253.81 2105.1,2253.81 2107.07,2255.78 2107.07,2261.64 2105.1,2263.61 2062.88,2263.61 2060.91,2265.57 2060.91,2271.43 2062.88,2273.4 2083.99,2273.4 ; 2083.99,2313.95 2083.99,2323.75 2083.99,2333.54 ; 2083.99,2374.09 2062.88,2374.09 2060.91,2376.06 2060.91,2381.92 2062.88,2383.89 2105.1,2383.89 2107.07,2385.86 2107.07,2391.72 2105.1,2393.68 2083.99,2393.68 ; 2083.99,2434.24 2061.7,2434.24 2059.73,2436.2 2059.73,2442.06 2061.7,2444.03 2106.28,2444.03 2108.25,2446 2108.25,2451.86 2106.28,2453.83 2083.99,2453.83 ; 2083.99,2494.38 2059.57,2494.38 2057.6,2496.35 2057.6,2502.2 2059.57,2504.17 2108.41,2504.17 2110.38,2506.14 2110.38,2512 2108.41,2513.97 2083.99,2513.97
  Top Layer w8.4: RAD_U29.B5@1729.75,1415.93 2220.58,1415.93 ccw(c2220.58,1515.65) 2320.3,1515.65 2320.3,1632.41 ccw(c2233.71,1632.41) 2233.71,1719.01 2183.99,1719.01 cw(c2183.99,1819.01) 2083.99,1819.01 2083.99,1981.51 ; 2083.99,1980.52 2046.59,1980.52 2046.59,2323.75 2083.99,2323.75
TI_TX3: RAD_U29.B7 | length 2387.1
  Top Layer w4: 2238.28,2010.1 2262.7,2010.1 2264.67,2012.07 2264.67,2017.93 2262.7,2019.9 2213.86,2019.9 2211.9,2021.86 2211.9,2027.72 2213.86,2029.69 2238.28,2029.69 ; 2238.28,2070.24 2260.57,2070.24 2262.54,2072.21 2262.54,2078.07 2260.57,2080.04 2215.99,2080.04 2214.02,2082.01 2214.02,2087.86 2215.99,2089.83 2238.28,2089.83 ; 2238.28,2130.38 2259.39,2130.38 2261.36,2132.35 2261.36,2138.21 2259.39,2140.18 2217.17,2140.18 2215.2,2142.15 2215.2,2148.01 2217.17,2149.98 2238.28,2149.98 ; 2238.28,2190.53 2238.28,2200.32 2238.28,2210.12 ; 2238.28,2250.67 2217.17,2250.67 2215.2,2252.64 2215.2,2258.5 2217.17,2260.46 2259.39,2260.46 2261.36,2262.43 2261.36,2268.29 2259.39,2270.26 2238.28,2270.26 ; 2238.28,2310.81 2215.99,2310.81 2214.02,2312.78 2214.02,2318.64 2215.99,2320.61 2260.57,2320.61 2262.54,2322.57 2262.54,2328.43 2260.57,2330.4 2238.28,2330.4 ; 2238.28,2370.95 2213.86,2370.95 2211.9,2372.92 2211.9,2378.78 2213.86,2380.75 2262.7,2380.75 2264.67,2382.72 2264.67,2388.57 2262.7,2390.54 2238.28,2390.54
  Top Layer w8.4: RAD_U29.B7@1729.75,1364.75 2329.91,1364.75 ccw(c2329.91,1453.99) 2419.15,1453.99 2419.15,1710.08 ccw(c2353.05,1710.08) 2353.05,1776.18 2301.52,1776.18 cw(c2301.52,1839.41) 2238.28,1839.41 2238.28,1858.08 ; 2238.28,1857.1 2200.88,1857.1 2200.88,2200.32 2238.28,2200.32
TI_TX4: RAD_U29.B9 | length 2387.8
  Top Layer w4: 2546.82,2010.1 2571.24,2010.1 2573.21,2012.07 2573.21,2017.93 2571.24,2019.9 2522.41,2019.9 2520.44,2021.86 2520.44,2027.72 2522.41,2029.69 2546.82,2029.69 ; 2546.82,2070.24 2569.12,2070.24 2571.09,2072.21 2571.09,2078.07 2569.12,2080.04 2524.53,2080.04 2522.56,2082.01 2522.56,2087.86 2524.53,2089.83 2546.82,2089.83 ; 2546.82,2130.38 2567.94,2130.38 2569.91,2132.35 2569.91,2138.21 2567.94,2140.18 2525.71,2140.18 2523.74,2142.15 2523.74,2148.01 2525.71,2149.98 2546.82,2149.98 ; 2546.82,2190.53 2546.82,2200.32 2546.82,2210.12 ; 2546.82,2250.67 2525.71,2250.67 2523.74,2252.64 2523.74,2258.5 2525.71,2260.46 2567.94,2260.46 2569.91,2262.43 2569.91,2268.29 2567.94,2270.26 2546.82,2270.26 ; 2546.82,2310.81 2524.53,2310.81 2522.56,2312.78 2522.56,2318.64 2524.53,2320.61 2569.12,2320.61 2571.09,2322.57 2571.09,2328.43 2569.12,2330.4 2546.82,2330.4 ; 2546.82,2370.95 2522.41,2370.95 2520.44,2372.92 2520.44,2378.78 2522.41,2380.75 2571.24,2380.75 2573.21,2382.72 2573.21,2388.57 2571.24,2390.54 2546.82,2390.54
  Top Layer w8.4: RAD_U29.B9@1729.75,1313.57 2334.62,1313.57 ccw(c2334.62,1525.77) 2546.82,1525.77 2546.82,1858.08 ; 2546.82,1857.1 2509.42,1857.1 2509.42,2200.32 2546.82,2200.32
TI_VBGAP: RAD_C180.1 RAD_U29.K4
  other v13: 1525.03,1441.52
TI_VPP_1P7: RAD_C150.2 RAD_P1.1 RAD_U29.U3 | length 1776.7
  Top Layer w9.84: v2(1776.38,2984.25) RAD_P1.1@1792.32,2988.19
  SIG_B0 w9.84: v8(1615.75,1790.55) 1615.75,2831.5 1768.5,2984.25 v2(1776.38,2984.25)
  Bottom Layer w9.84: RAD_C150.2@1352.98,1472.23 1368.5,1491.34 1486.61,1491.34 1615.75,1620.47 v8(1615.75,1790.55)
  other v13: 1345.89,1467.11
TI_VPP_EN: RAD_U29.U8
TI_XDSET_UARTA_RX: RAD_R129.2 U_USB.18 | length 1872.9
  Top Layer w6.69: RAD_R129.2@991.34,1156.3 v7(1020.47,1125.98)
  SIG_A0 w6.69: v7(1020.47,1125.98) 1082.05,1125.98 1133.23,1074.8 1148.62,1074.8 1159.94,1074.8 1228.84,1005.91 1240.16,1005.91 1272.64,1005.91 1286.42,1021.65 v2(1286.61,1051.97)
  SIG_B0 w6.69: v2(1286.61,1051.97) 1581.1,1173.23 v8(1667.72,1173.23) ; v8(1848.82,1188.98) 1951.18,1097.64 2006.3,1042.52 2299.21,1042.52 2313.39,1029.92 2351.18,1031.5 2393.7,1074.02 2505.51,1074.02 2505.51,1076.54 2549.61,1120.63 2549.61,1130.71 v8(2549.61,1144.88) ; v10(2549.21,1124.02) v8(2566.93,1155.51)
  Bottom Layer w6.69: v8(1667.72,1173.23) 1828.35,1188.98 v8(1848.82,1188.98) ; U_USB.18@2548.03,1137.01 v8(2549.61,1144.88) 2564.96,1155.51 v8(2566.93,1155.51)
TI_XDSET_UARTA_TX: RAD_R128.2 U_USB.17 | length 1110
  Top Layer w6.69: RAD_R128.2@1749.21,1638.58 v9(1751.97,1637.8)
  SIG_A0 w6.69: v9(1751.97,1637.8) 1854.33,1549.21 1872.05,1543.31 1905.51,1525.59 v2(1925.2,1525.59)
  SIG_B0 w6.69: v2(1925.2,1525.59) v8(2037.4,1413.39) ; v8(2084.65,1413.39) 2167.32,1214.57 2183.07,1198.82 2183.07,1137.8 2198.82,1124.02 2260.83,1124.02 2266.73,1118.11 2307.09,1118.11 2320.87,1131.89 2368.11,1175.2 2391.73,1175.2 2397.15,1171.26 2400.1,1170.28 2411.42,1170.28 2462.6,1173.23 v8(2496.06,1139.76)
  Bottom Layer w6.69: v8(2037.4,1413.39) v8(2084.65,1413.39) ; v8(2496.06,1139.76) U_USB.17@2528.35,1137.01
TI_XREF_CLK0: RAD_U29.B13
TI_XREF_CLK1: RAD_U29.D11
TI_XTALM: RAD_C108.1 RAD_U29.B1 RAD_Y3.3 | length 315.3
  Top Layer w6: RAD_U29.B1@1729.75,1518.3 1747.05,1536.42 1854.33,1581.69 RAD_C108.1@1876.7,1604.58 1849.41,1631.89 1832.68,1658.46 1832.68,1694.88 1844.49,1706.69 RAD_Y3.3@1859.26,1718.02
TI_XTALP: RAD_C106.1 RAD_U29.D1 RAD_Y3.1 | length 207.6
  Top Layer w6: RAD_U29.D1@1678.57,1518.3 1678.57,1519.47 1747.97,1588.86 RAD_C106.1@1747.97,1604.37 RAD_Y3.1@1806.11,1676.68
U5_PG: R5P.1 U5.4 | length 253.9
  Top Layer w7.09: v2(2814.96,1506.89) v2(2937.01,1628.94)
  Bottom Layer w7.09: U5.4@2765.75,1494.59 2765.75,1494.09 2778.54,1506.89 2785.43,1506.89 2786.42,1507.87 2790.35,1507.87 2791.34,1508.86 2809.06,1508.86 2811.02,1506.89 v2(2814.96,1506.89) ; v2(2937.01,1628.94) 2954.72,1628.94 R5P.1@2959.65,1633.86
U5_SS_LOCAL: C3.1 U5.9 | length 166.2
  Bottom Layer w7.09: U5.9@2765.75,1379.43 2766.73,1378.94 2805.12,1340.55 2805.12,1302.17 2855.32,1251.97 C3.1@2854.33,1250.98
U6_BGATE: Q6.4 Q7.3 U6.3 | length 509
  Bottom Layer w7.87: Q7.3@866.14,1459.15 866.14,1458.66 868.11,1460.63 879.92,1460.63 907.48,1488.19 935.04,1488.19 996.06,1549.21 Q6.4@1009.84,1549.21 ; Q6.4@1010.24,1550 Q6.4@1009.84,1549.21 ; U6.3@1242.62,1722.44 1242.13,1722.44 1226.38,1722.44 1220.47,1716.54 1218.5,1716.54 1216.54,1714.57 1175.2,1714.57 1153.54,1692.91 1116.14,1692.91 1039.37,1616.14 1039.37,1578.74 Q6.4@1009.84,1549.21
U6_DRV: Q7.1 U6.4 | length 459.1
  SIG_B1 w7.87: v15(948.82,1590.55) 950.79,1592.52 986.22,1592.52 1033.46,1639.76 1057.09,1639.76 1062.99,1645.67 1062.99,1647.64 1064.96,1649.61 1064.96,1685.04 v19(1102.36,1722.44)
  Bottom Layer w6.69: v19(1102.36,1722.44) 1104.33,1724.41 1116.14,1724.41 1120.08,1728.35 1212.6,1728.35 1220.81,1736.55 1236.22,1737.17 1242.13,1742.13 U6.4@1242.62,1742.13
  Bottom Layer w7.09: Q7.1@903.54,1532.97 901.57,1531.5 948.82,1578.74 v15(948.82,1590.55)
U6_DVDT: C6D.1 U6.9 | length 70.7
  Bottom Layer w7.87: C6D.1@1287.4,1867.13 1287.4,1866.14 1307.09,1846.46 1307.09,1807.09 U6.9@1309.06,1808.56
U6_ILIM_LOCAL: R1.1 U6.10 | length 147.1
  Bottom Layer w7.87: U6.10@1328.74,1808.56 1326.77,1807.09 1330.71,1811.02 1330.71,1830.71 1338.58,1838.58 1429.13,1838.58 1440.94,1826.77 R1.1@1439.96,1826.77
U6_IN_BLOCKED: Q6.5 U6.1 U6.2 | length 282.3
  Bottom Layer w13.78: U6.1@1242.62,1683.07 1244.09,1685.04 1244.09,1700.79 U6.2@1242.62,1702.76
  Bottom Layer w14.17: Q6.5@1082.09,1511.81 1082.68,1511.81 1181.1,1610.24 1212.6,1610.24 1232.28,1629.92 1232.28,1673.23 1244.09,1685.04 U6.1@1242.62,1683.07
U6_OVP_LOCAL: R62.2 R63.1 U6.7 | length 1162.4
  Bottom Layer w6.3: R62.2@1243.11,1915.35 1244.09,1913.39 1259.84,1897.64 1258.56,1842.85 1267.72,1834.65 1267.72,1807.09 U6.7@1269.68,1808.56
  Bottom Layer w6.69: R62.2@1243.11,1915.35 1244.09,1913.39 1259.84,1897.64 1258.01,1838.92 1267.72,1830.71 1267.72,1807.09 U6.7@1269.68,1808.56
  Bottom Layer w7.87: R63.1@1013.78,1892.72 1011.81,1893.7 980.32,1862.2 980.32,1807.09 976.38,1803.15 921.26,1803.15 889.76,1771.65 814.96,1771.65 807.09,1779.53 807.09,1803.15 830.71,1826.77 830.71,1921.26 834.65,1925.2 893.7,1925.2 952.76,1984.25 960.63,1984.25 964.57,1988.19 1062.99,1988.19 1066.93,1984.25 1074.8,1984.25 1114.17,1944.88 1200.79,1944.88 1232.28,1913.39 1244.09,1913.39 R62.2@1243.11,1915.35
U6_PGTH_LOCAL: R804.2 R805.1 U6.15 | length 417.4
  Bottom Layer w7.87: U6.15@1395.18,1742.13 1413.39,1742.13 1421.26,1750 1421.26,1751.97 1429.13,1764.13 1476.38,1759.84 1488.19,1771.65 1492.13,1771.65 1494.09,1773.62 1539.37,1773.62 1541.34,1771.65 1545.28,1771.65 1555.59,1762.28 1559.06,1761.81 1561.02,1759.84 1562.99,1759.84 1566.93,1755.91 1566.93,1753.94 1570.87,1751.97 1568.9,1734.25 1543.31,1708.66 1543.31,1688.98 R804.2@1503.94,1649.61 ; R805.1@1463.58,1582.68 1464.57,1582.68 1478.35,1596.46 1478.35,1624.02 R804.2@1503.94,1649.61 ; R804.2@1504.92,1649.61 R804.2@1503.94,1649.61
U6_UVLO_LOCAL: R61.2 R62.1 U6.6 | length 263.3
  Bottom Layer w7.87: R61.2@1125,1901.57 R61.2@1125.98,1901.57 ; R62.1@1178.15,1915.35 1177.17,1913.39 1165.35,1901.57 R61.2@1125.98,1901.57 ; U6.6@1242.62,1781.5 1244.09,1783.46 1200.79,1826.77 1200.79,1885.83 1192.91,1893.7 1133.86,1893.7 R61.2@1125.98,1901.57
U7_DVDT: C7D.1 U7.7 | length 133.2
  Bottom Layer w6.69: C7D.1@1732.28,1684.06 1732.28,1685.04 1740.16,1692.91 1740.16,1712.6 1763.78,1736.22 U7.7@1762.8,1737.2
  Bottom Layer w7.09: C7D.1@1732.28,1684.06 1732.28,1685.04 1740.16,1692.91 1740.16,1712.6 1763.78,1736.22 U7.7@1762.8,1737.2
U7_ILIM_LOCAL: R2.1 U7.9 | length 743.6
  Bottom Layer w7.09: U7.9@1755.91,1780.51 1755.91,1779.53 1724.41,1779.53 1712.6,1767.72 1681.1,1767.72 1677.17,1763.78 1677.17,1759.84 1673.23,1755.91 1673.23,1712.6 1700.79,1685.04 1700.79,1661.42 1708.66,1653.54 1755.91,1653.54 1913.39,1496.06 2173.23,1496.06 R2.1@2172.24,1496.06
U7_OVLO_LOCAL: R72.2 R73.1 U7.2 | length 1141.9
  Bottom Layer w7.09: U7.2@1826.77,1780.51 1826.77,1779.53 1866.14,1779.53 1870.08,1783.46 1921.26,1783.46 1968.5,1736.22 1984.25,1736.22 2051.18,1669.29 2102.36,1669.29 2106.3,1665.35 2106.3,1614.17 2200.79,1519.68 2200.79,1472.44 2192.91,1464.57 2161.42,1464.57 2015.75,1318.9 R72.2@2014.76,1318.9
  Bottom Layer w7.87: R73.1@1961.61,1240.16 1960.63,1240.16 1964.57,1244.09 1968.5,1244.09 1992.13,1267.72 2082.68,1267.72 2106.3,1291.34 2106.3,1346.46 2102.36,1350.39 2059.06,1350.39 2027.56,1318.9 2015.75,1318.9 R72.2@2014.76,1318.9
U7_UVLO_LOCAL: R71.2 R72.1 U7.1 | length 1545.3
  Bottom Layer w6.3: U7.1@1819.88,1806.1 1818.9,1807.09 1842.52,1807.09 1870.08,1834.65 2007.87,1834.65 2011.81,1830.71 2011.81,1799.21 2035.43,1775.59 2070.87,1775.59 2075.79,1771.65 2075.79,1720.47 2118.11,1677.17 2118.11,1673.23 2122.05,1669.29 2122.05,1661.42 2263.78,1519.68 2263.78,1472.44 2259.84,1468.5 2231.95,1467.7 2200.79,1437.01 2200.79,1389.76 2177.17,1389.29 2122.05,1334.65 2122.05,1287.4 2118.11,1283.46 2118.11,1279.53 2102.36,1263.78 2102.36,1216.54 2098.43,1213.07 1935.95,1211.54 1937.01,1279.53 1897.64,1318.9 R71.2@1896.65,1318.9
  Bottom Layer w7.09: R71.2@1896.65,1318.9 R71.2@1897.64,1318.9
  Bottom Layer w7.87: R71.2@1896.65,1318.9 1897.64,1318.9 1909.45,1318.9 1940.94,1287.4 2047.24,1287.4 2078.74,1318.9 R72.1@2079.72,1318.9
U8_BOOT: C805.1 U8.6 | length 80.1
  Bottom Layer w7.87: C805.1@1105.32,2519.68 1106.3,2519.68 1141.73,2555.12 U8.6@1141.73,2584.15
U8_ENABLE: R806.1 U6.16 U8.18 | length 1550.3
  SIG_B1 w7.87: v15(1082.68,2759.84) 1110.24,2732.28 1212.6,2732.28 1216.54,2728.35 1220.47,2728.35 1244.09,2704.72 1244.09,2700.79 1248.03,2696.85 1248.03,2692.91 1251.97,2688.98 1251.97,2590.55 1358.27,2484.25 1358.27,2153.54 1531.5,1980.32 1531.5,1771.65 1535.43,1767.72 1535.43,1759.84 v19(1551.18,1744.09)
  Bottom Layer w6.3: R806.1@1451.77,1732.28 1452.76,1732.28 1468.5,1732.28 1499.09,1760.51 1535.43,1759.84 1541.34,1755.91 1541.34,1753.94 v19(1551.18,1744.09)
  Bottom Layer w7.09: U8.18@1082.68,2730.81 v15(1082.68,2759.84) ; U6.16@1395.18,1722.44 1393.7,1724.41 1444.88,1724.41 1452.76,1732.28 R806.1@1451.77,1732.28
  Bottom Layer w7.87: U6.16@1395.18,1722.44 1393.7,1724.41 1444.88,1724.41 1452.76,1732.28 R806.1@1451.77,1732.28
U8_FB_LOCAL: R800.2 R801.1 U8.12 | length 227
  SIG_B1 w7.09: v15(937.01,2653.54) 968.5,2622.05 v15(1000,2622.05)
  Bottom Layer w7.09: R800.2@912.4,2659.45 913.39,2657.48 933.07,2657.48 v15(937.01,2653.54) ; v15(1000,2622.05) 1003.94,2625.98 1023.62,2625.98 U8.12@1024.11,2627.95
  Bottom Layer w7.87: R800.2@912.4,2659.45 913.39,2657.48 960.63,2704.72 960.63,2708.66 976.38,2724.41 R801.1@977.36,2724.41
U8_PGOOD: R803.1 U8.16 | length 110.5
  Bottom Layer w7.87: R803.1@954.72,2772.64 952.76,2771.65 968.5,2755.91 996.06,2755.91 1000,2751.97 1003.94,2751.97 1023.62,2732.28 1043.31,2732.28 U8.16@1043.31,2730.81
U8_RT_LOCAL: R802.1 U8.10 | length 647.9
  Bottom Layer w6.3: R802.1@843.5,2604.33 842.52,2602.36 846.46,2598.43 854.33,2598.43 874.02,2578.74 874.02,2570.87 877.95,2566.93 877.95,2531.5 881.89,2527.56 916.99,2525.81 925.2,2519.68 984.25,2519.68 1019.68,2555.12 1054.78,2554.31 1059.06,2559.06 1059.06,2578.74 1062.99,2582.68 U8.10@1062.99,2584.15
  Bottom Layer w7.09: R802.1@843.5,2604.33 842.52,2602.36 846.46,2598.43 858.27,2598.43 874.02,2582.68 874.02,2570.87 877.95,2566.93 877.95,2527.56 916.99,2525.81 925.2,2519.68 988.19,2519.68 1023.62,2555.12 1057.38,2553.45 1059.06,2578.74 1062.99,2582.68 U8.10@1062.99,2584.15
U8_SW: C805.2 L8.1 U8.1 U8.2 U8.3 U8.4 U8.5 | length 289.8
  Bottom Layer w12.6: U8.5@1161.42,2584.15 1161.42,2582.68 U8.4@1181.1,2582.68 ; U8.4@1181.1,2584.15 U8.4@1181.1,2582.68 ; U8.3@1200.79,2584.15 U8.3@1200.79,2582.68 ; U8.2@1220.47,2584.15 U8.2@1220.47,2582.68 ; U8.1@1240.16,2584.15 1240.16,2582.68 U8.2@1220.47,2582.68 ; U8.4@1181.1,2582.68 U8.3@1200.79,2582.68 ; U8.3@1200.79,2582.68 U8.2@1220.47,2582.68
  Bottom Layer w13.39: U8.5@1161.42,2584.15 1161.42,2582.68 1161.42,2523.62 1165.35,2519.68 C805.2@1166.34,2519.68
  Bottom Layer w21.26: L8.1@1062.99,2447.24 1062.99,2448.82 1070.87,2456.69 1106.3,2456.69 1141.73,2492.13 1141.73,2496.06 1165.35,2519.68 C805.2@1166.34,2519.68
U8_VCC: C803.1 U8.8 | length 239.3
  SIG_A1 w6.3: v14(1006.3,2587.4) 1037.8,2555.91 v2(1100.79,2555.91)
  SIG_B1 w7.48: v15(976.38,2566.93) 980.32,2570.87 v19(1003.94,2570.87)
  Bottom Layer w5.91: C803.1@960.63,2548.23 960.63,2547.24 976.38,2562.99 v15(976.38,2566.93)
  Bottom Layer w6.3: v19(1003.94,2570.87) 1004.72,2570.08 1006.3,2571.65 v14(1006.3,2587.4) ; v2(1100.79,2555.91) 1100.79,2582.68 1102.36,2584.25 U8.8@1102.36,2584.15
  Bottom Layer w7.09: C803.1@960.63,2548.23 960.63,2547.24 976.38,2562.99 v15(976.38,2566.93)
U9_PG: R90.1 U9.4 | length 442.3
  SIG_A1 w7.09: v2(1346.46,2973.43) v2(1545.28,2969.49)
  Bottom Layer w7.09: v2(1346.46,2973.43) 1406.5,2973.43 1452.76,2926.18 1420.28,2958.66 1378.94,2958.66 1377.95,2959 R90.1@1377.95,2959.65 ; v2(1545.28,2969.49) 1541.34,2982.28 1540,2982.28 U9.4@1553.64,2982.28
U9_SS_LOCAL: C92.1 U9.9 | length 835.4
  Bottom Layer w7.09: U9.9@1438.48,2982.28 1438.98,2982.28 1419.29,2982.28 1409.45,2992.13 1358.27,2992.13 1348.43,3001.97 1348.43,3047.24 1423.23,3122.05 1783.46,3122.05 1842.52,3181.1 1846.46,3181.1 1848.43,3183.07 1962.6,3183.07 1976.38,3169.29 C92.1@1977.36,3169.29
USB_BRIDGE_RESET_N: R_USB_RESET.2 U_USB.9 | length 381
  SIG_A1 w6.69: v2(2557.09,959.65) 2557.09,992.13 v31(2695.87,1130.91)
  Bottom Layer w6.69: U_USB.9@2549.21,1001.97 2548.23,1000.98 2548.23,968.5 v2(2557.09,959.65) ; R_USB_RESET.2@2657.48,1220.87 2657.48,1219.49 2681.1,1195.87 2681.1,1160.43 2695.87,1145.67 v31(2695.87,1130.91)
USB_CTS_N: R_USB_CTS.2 U_USB.15 | length 130
  SIG_B0 w6.69: v10(2498.03,1092.52) 2530.51,1180.12 v8(2541.34,1194.88)
  Bottom Layer w6.69: v8(2541.34,1194.88) R_USB_CTS.2@2558.66,1200.79
USB_DM: D_USB.2 JUSB1.2 U_USB.5 | length 2570
  SIG_B0 w7.8: v10(2422.64,964.57) 2459.65,931.1 2500.98,931.1 2603.35,1033.46 v8(2607.81,1033.46) ; v10(2624.02,1033.46) 2752.95,1033.46 2868.11,1148.62 v2(2868.11,1155.51) ; v10(2694.88,2938.98) 2694.88,2935.04 2742.13,2887.8 2742.13,2856.3 v2(2789.37,2809.06) 2809.06,2809.06 2897.64,2720.47 2897.64,1927.17 2956.69,1868.11 2956.69,1446.85 2915.35,1405.51 2915.35,1403.54 2913.39,1403.54 2877.95,1368.11 2877.95,1246.06 2920,1205.51 v8(2940,1155.51)
  Bottom Layer w9.57: v2(2868.11,1155.51) v8(2940,1155.51)
USB_DP: D_USB.1 JUSB1.3 U_USB.4 | length 2578.9
  SIG_B0 w7.8: v8(2445.87,1000.98) 2478.35,1035.43 2584.65,1035.43 2600.39,1051.18 v8(2644.68,1052.17) 2750.98,1052.17 2849.41,1150.59 2849.41,1164.37 2866.14,1181.1 v2(2893.7,1181.1) ; v10(2716.54,2938.98) v2(2814.96,2834.65) 2913.39,2736.22 2913.39,1935.04 2972.44,1875.98 2972.44,1438.98 2893.7,1360.24 2965.59,1285 v8(2965.59,1181.1)
  Bottom Layer w9.57: D_USB.1@2422.64,985.24 v8(2445.87,1000.98) ; U_USB.4@2620.08,1053.15 v8(2644.68,1052.17) ; v2(2893.7,1181.1) v8(2965.59,1181.1)
USB_VBUS: D_USB.4 JUSB1.1 R_USB_VBUS_H.1 | length 2471
  SIG_B1 w8.66: v2(2477.36,1006.89) 2557.09,927.17 v2(2675.2,927.17) ; v2(2665.35,2897.64) 2665.35,2539.37 2633.86,2507.87 2633.86,1657.48 2692.91,1598.43 2692.91,1594.49 2700.79,1594.49 2700.79,1590.55 2704.72,1590.55 2704.72,1586.61 2712.6,1578.74 2712.6,1409.45 2688.98,1385.83 2688.98,1173.23 2716.54,1145.67 v2(2716.54,940.94)
  Bottom Layer w8.66: D_USB.4@2416.73,925.2 2415.35,924.21 2430.12,924.21 2447.83,941.93 2447.83,977.36 v2(2477.36,1006.89) ; v2(2665.35,2897.64) 2665.35,2937.01 JUSB1.1@2665.35,2938.98 ; v2(2675.2,927.17) 2692.91,927.17 2695.87,924.21 2696.85,924.8 2696.85,925.2 2700.79,925.2 v2(2716.54,940.94)
USB_VBUS_SENSE: R_USB_VBUS_H.2 R_USB_VBUS_L.1 U_USB.8 | length 444.5
  SIG_B1 w6.69: v2(2586.61,959.65) v2(2675.2,959.65)
  Bottom Layer w6.69: U_USB.8@2568.9,1001.97 2568.9,1000.98 2571.85,998.03 2571.85,974.41 v2(2586.61,959.65) ; v2(2675.2,959.65) 2689.96,959.65 R_USB_VBUS_H.2@2695.87,965.55 ; R_USB_VBUS_H.2@2696.85,964.96 R_USB_VBUS_H.2@2695.87,965.55 ; R_USB_VBUS_L.1@2756.3,1161.42 2754.92,1160.43 2799.21,1116.14 2799.21,1027.56 2787.4,1015.75 2746.06,1015.75 R_USB_VBUS_H.2@2695.87,965.55
USB_WAKE_N: R_USB_WAKE.2 U_USB.13 | length 279.2
  SIG_B0 w6.69: v10(2498.03,1053.15) v8(2755.91,1082.68)
  Bottom Layer w6.69: v8(2755.91,1082.68) R_USB_WAKE.2@2775.59,1083.07